# Altium PCB HSR_V2.PcbDoc
Units mm, origin at the board's own origin, x right, y up, seen from the top; angles counter-clockwise.
Board outline 140 x 140 mm, 4 copper layers (Top Layer, Layer 1, Layer 2, Bottom Layer), stack 0.603 mm thick; 53 components, 62 nets, 256 pads, 774 vias.
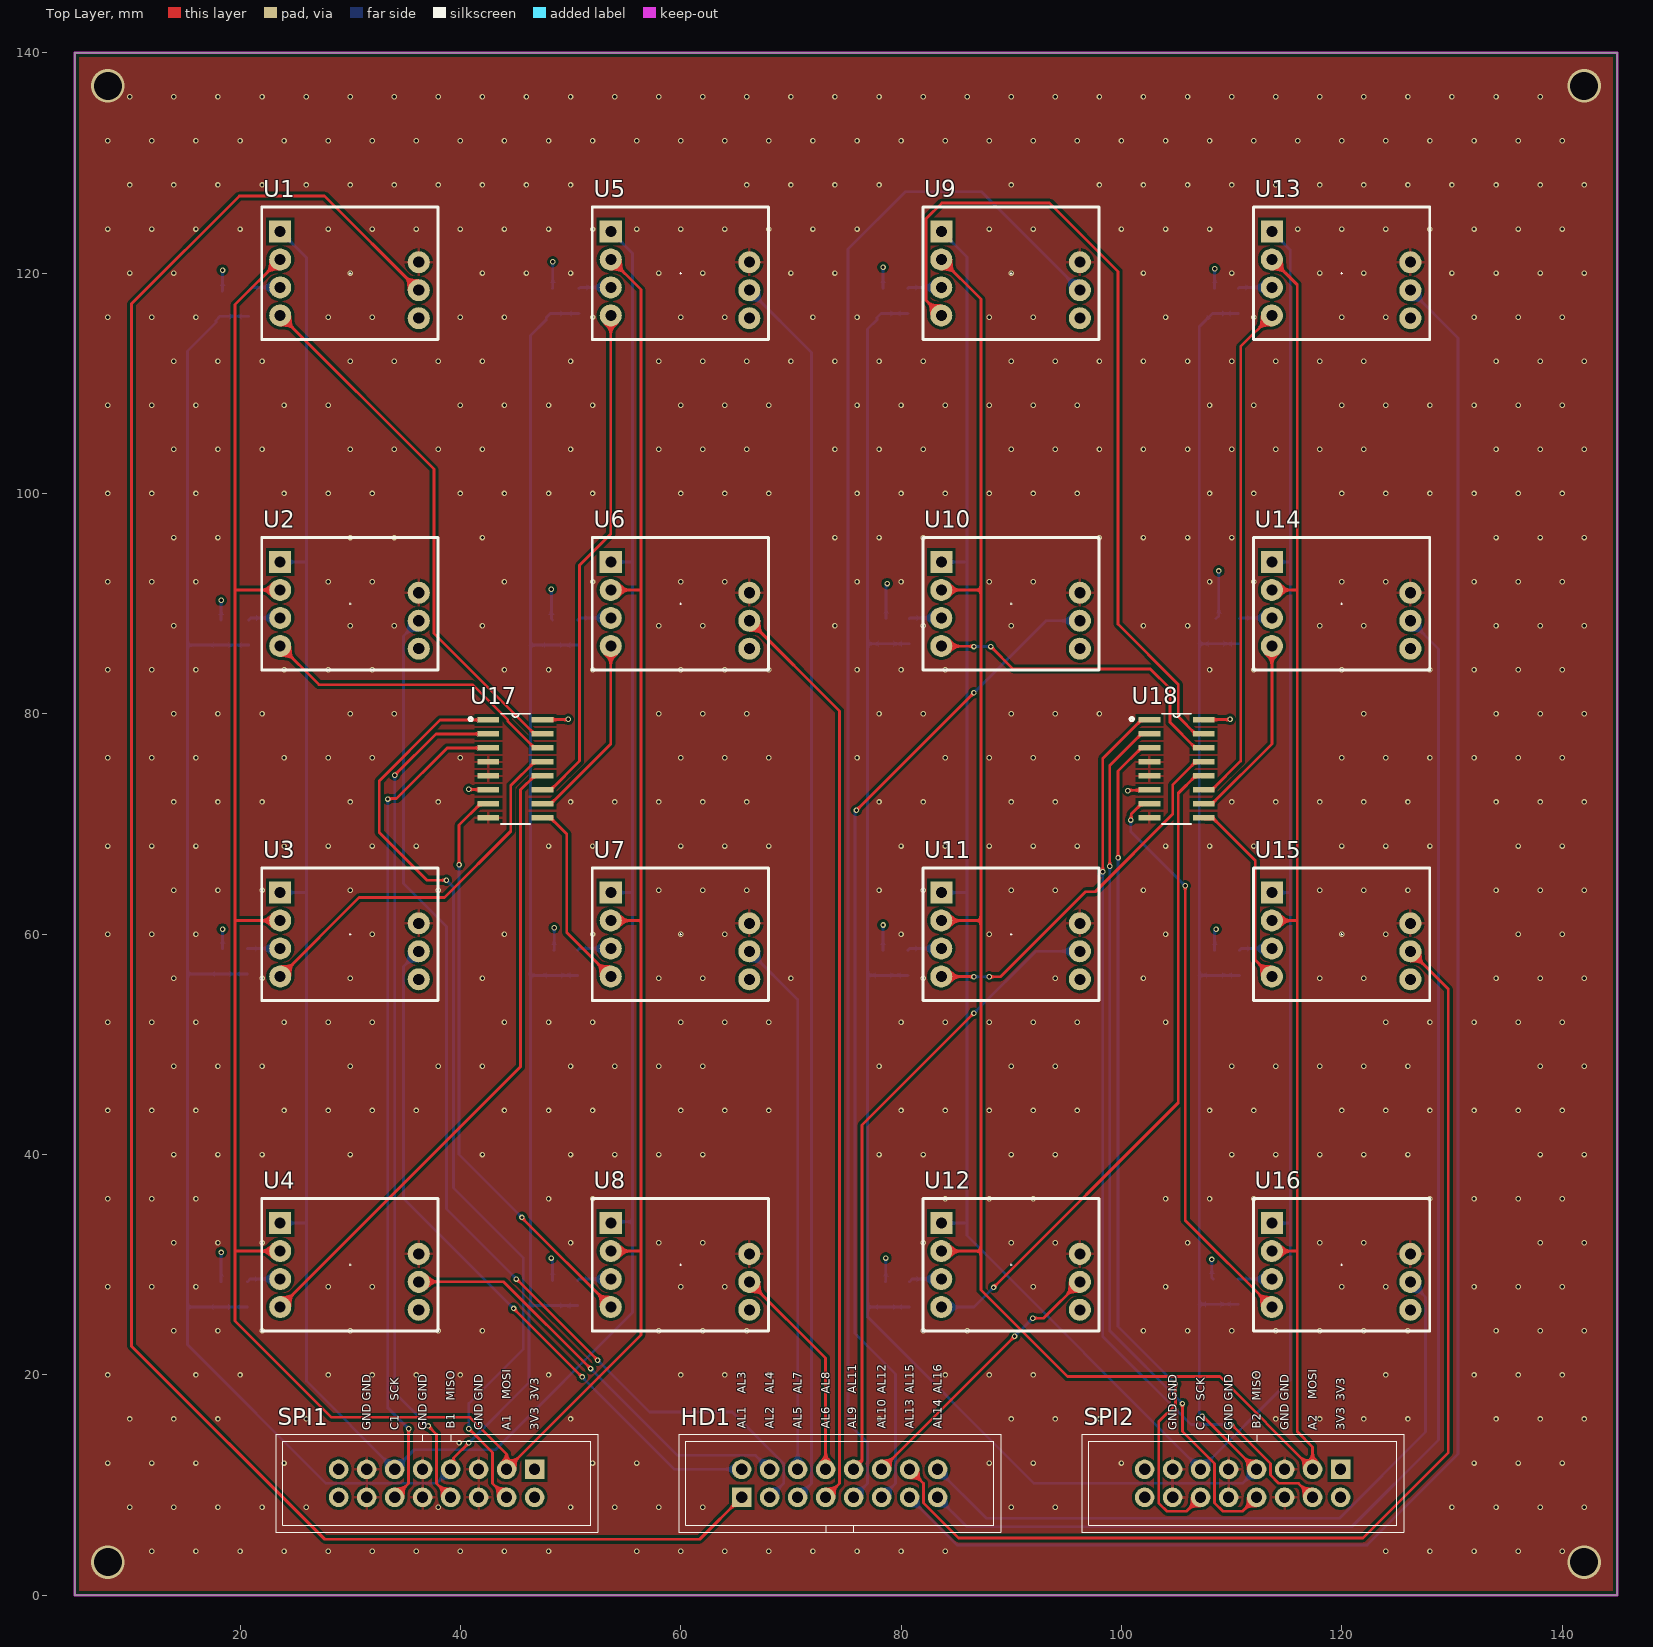
[diagram p0: Top Layer view]
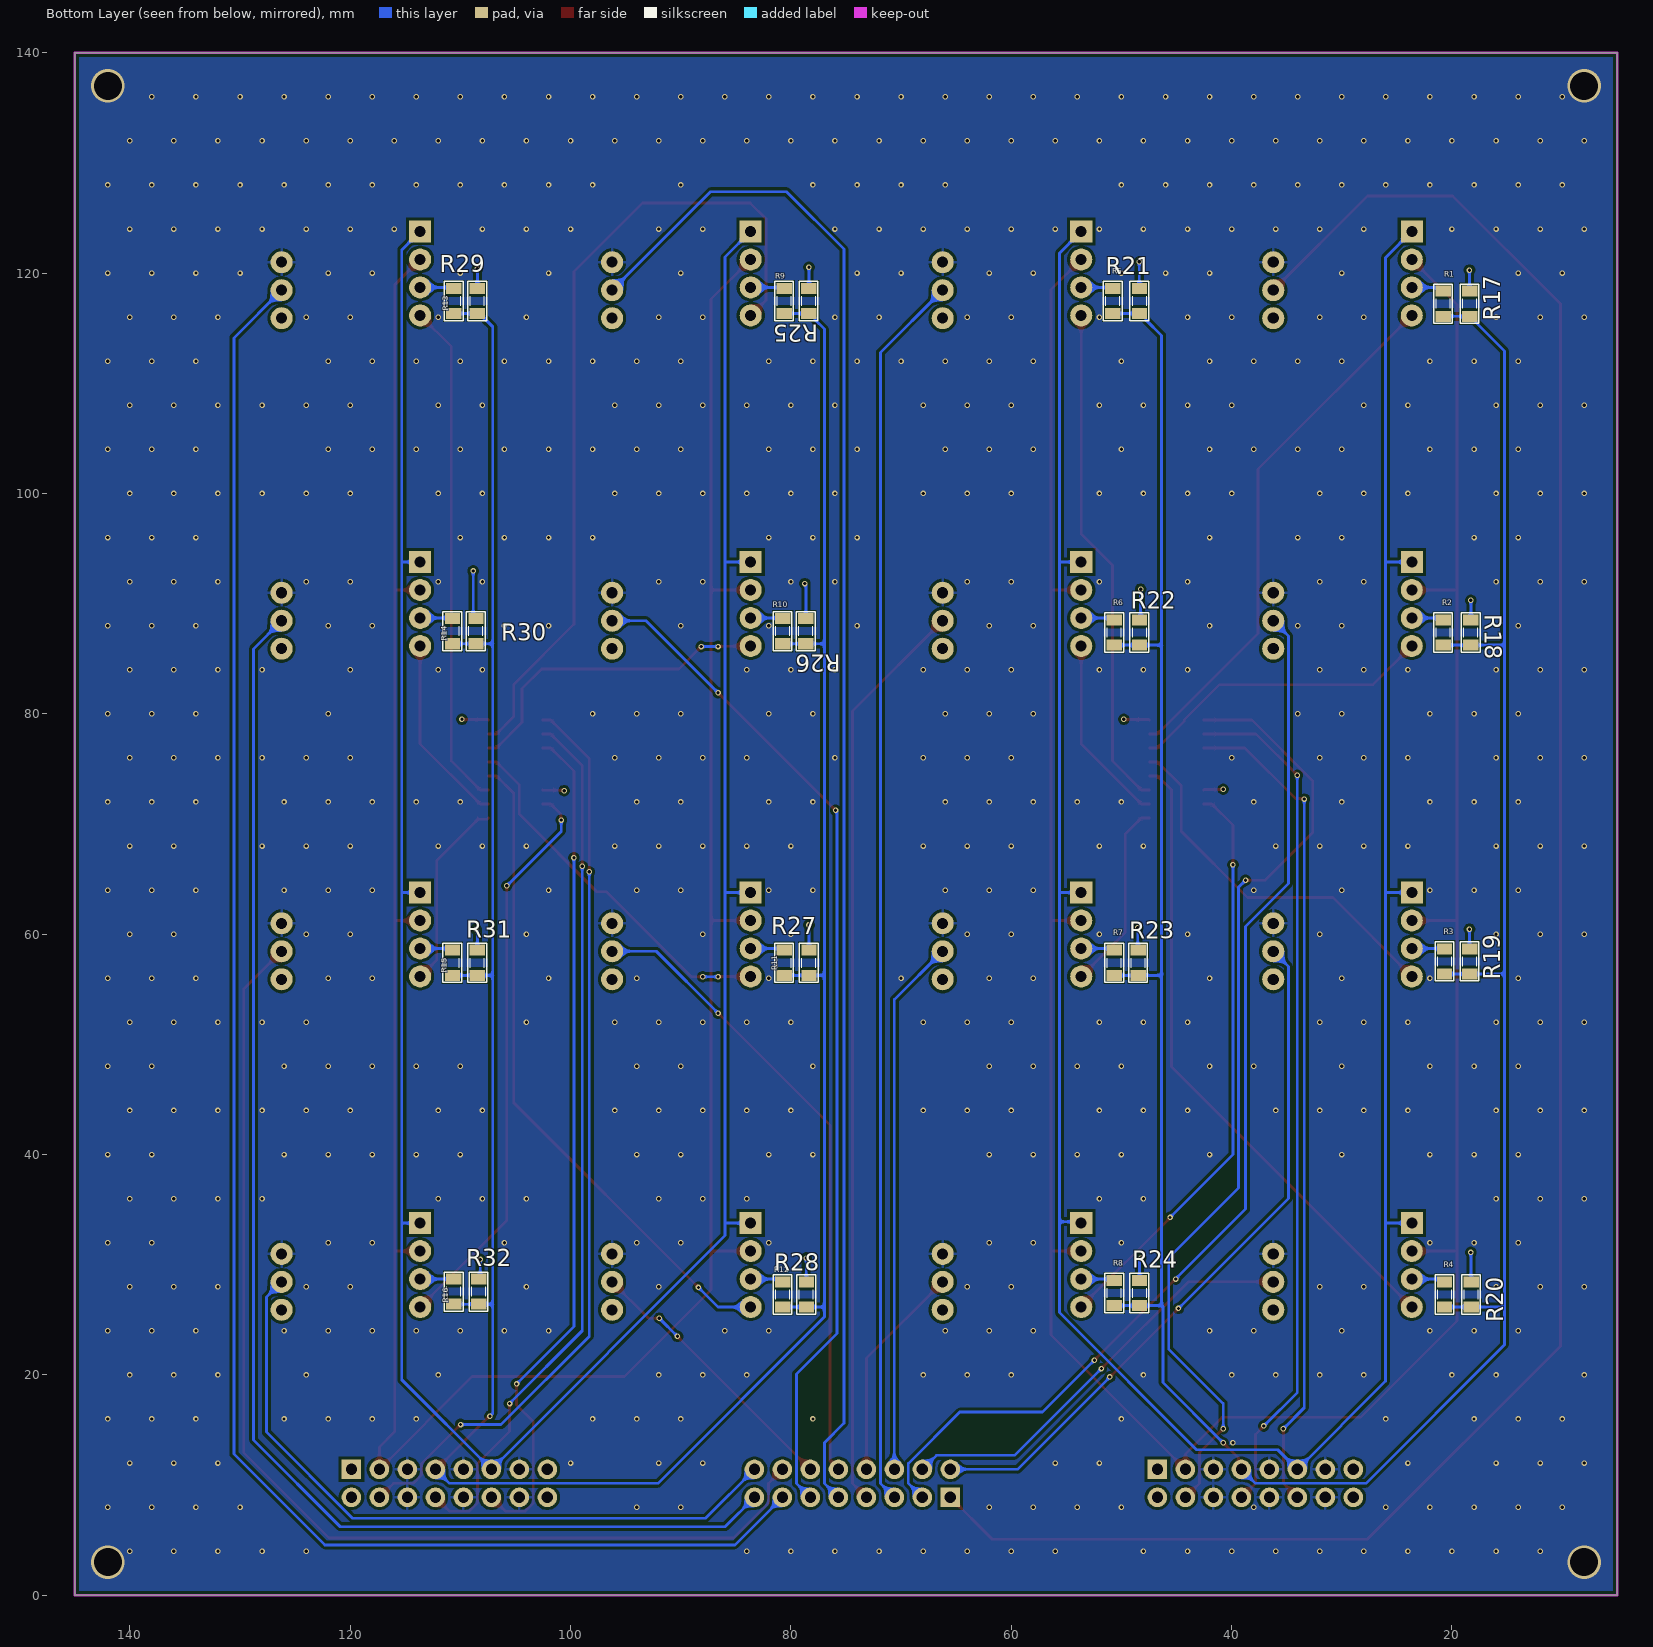
[diagram p1: Bottom Layer view, seen from below]
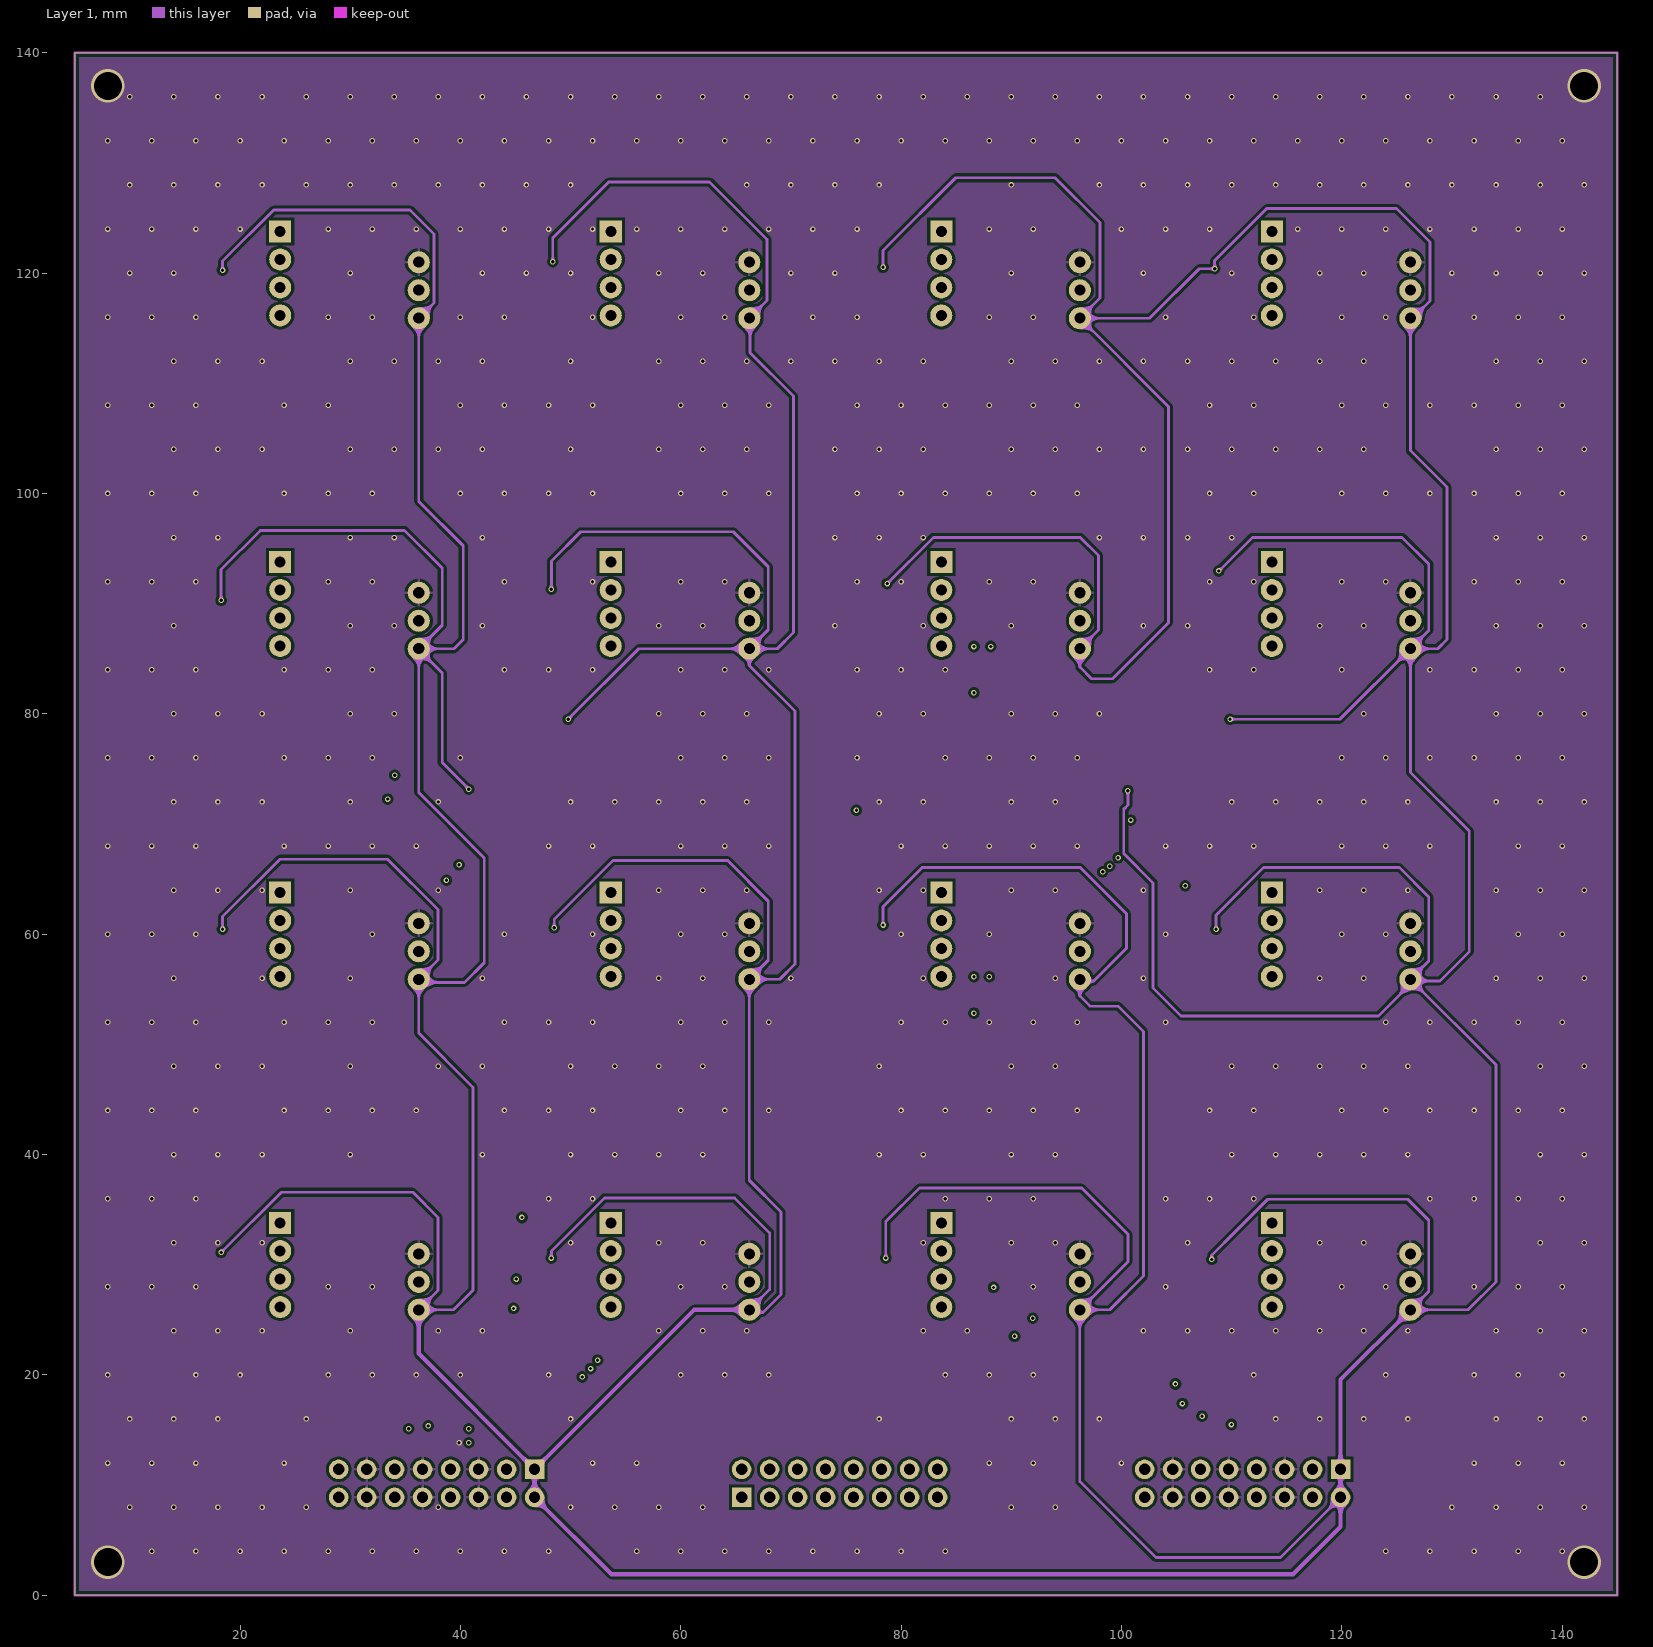
[diagram p2: Layer 1]
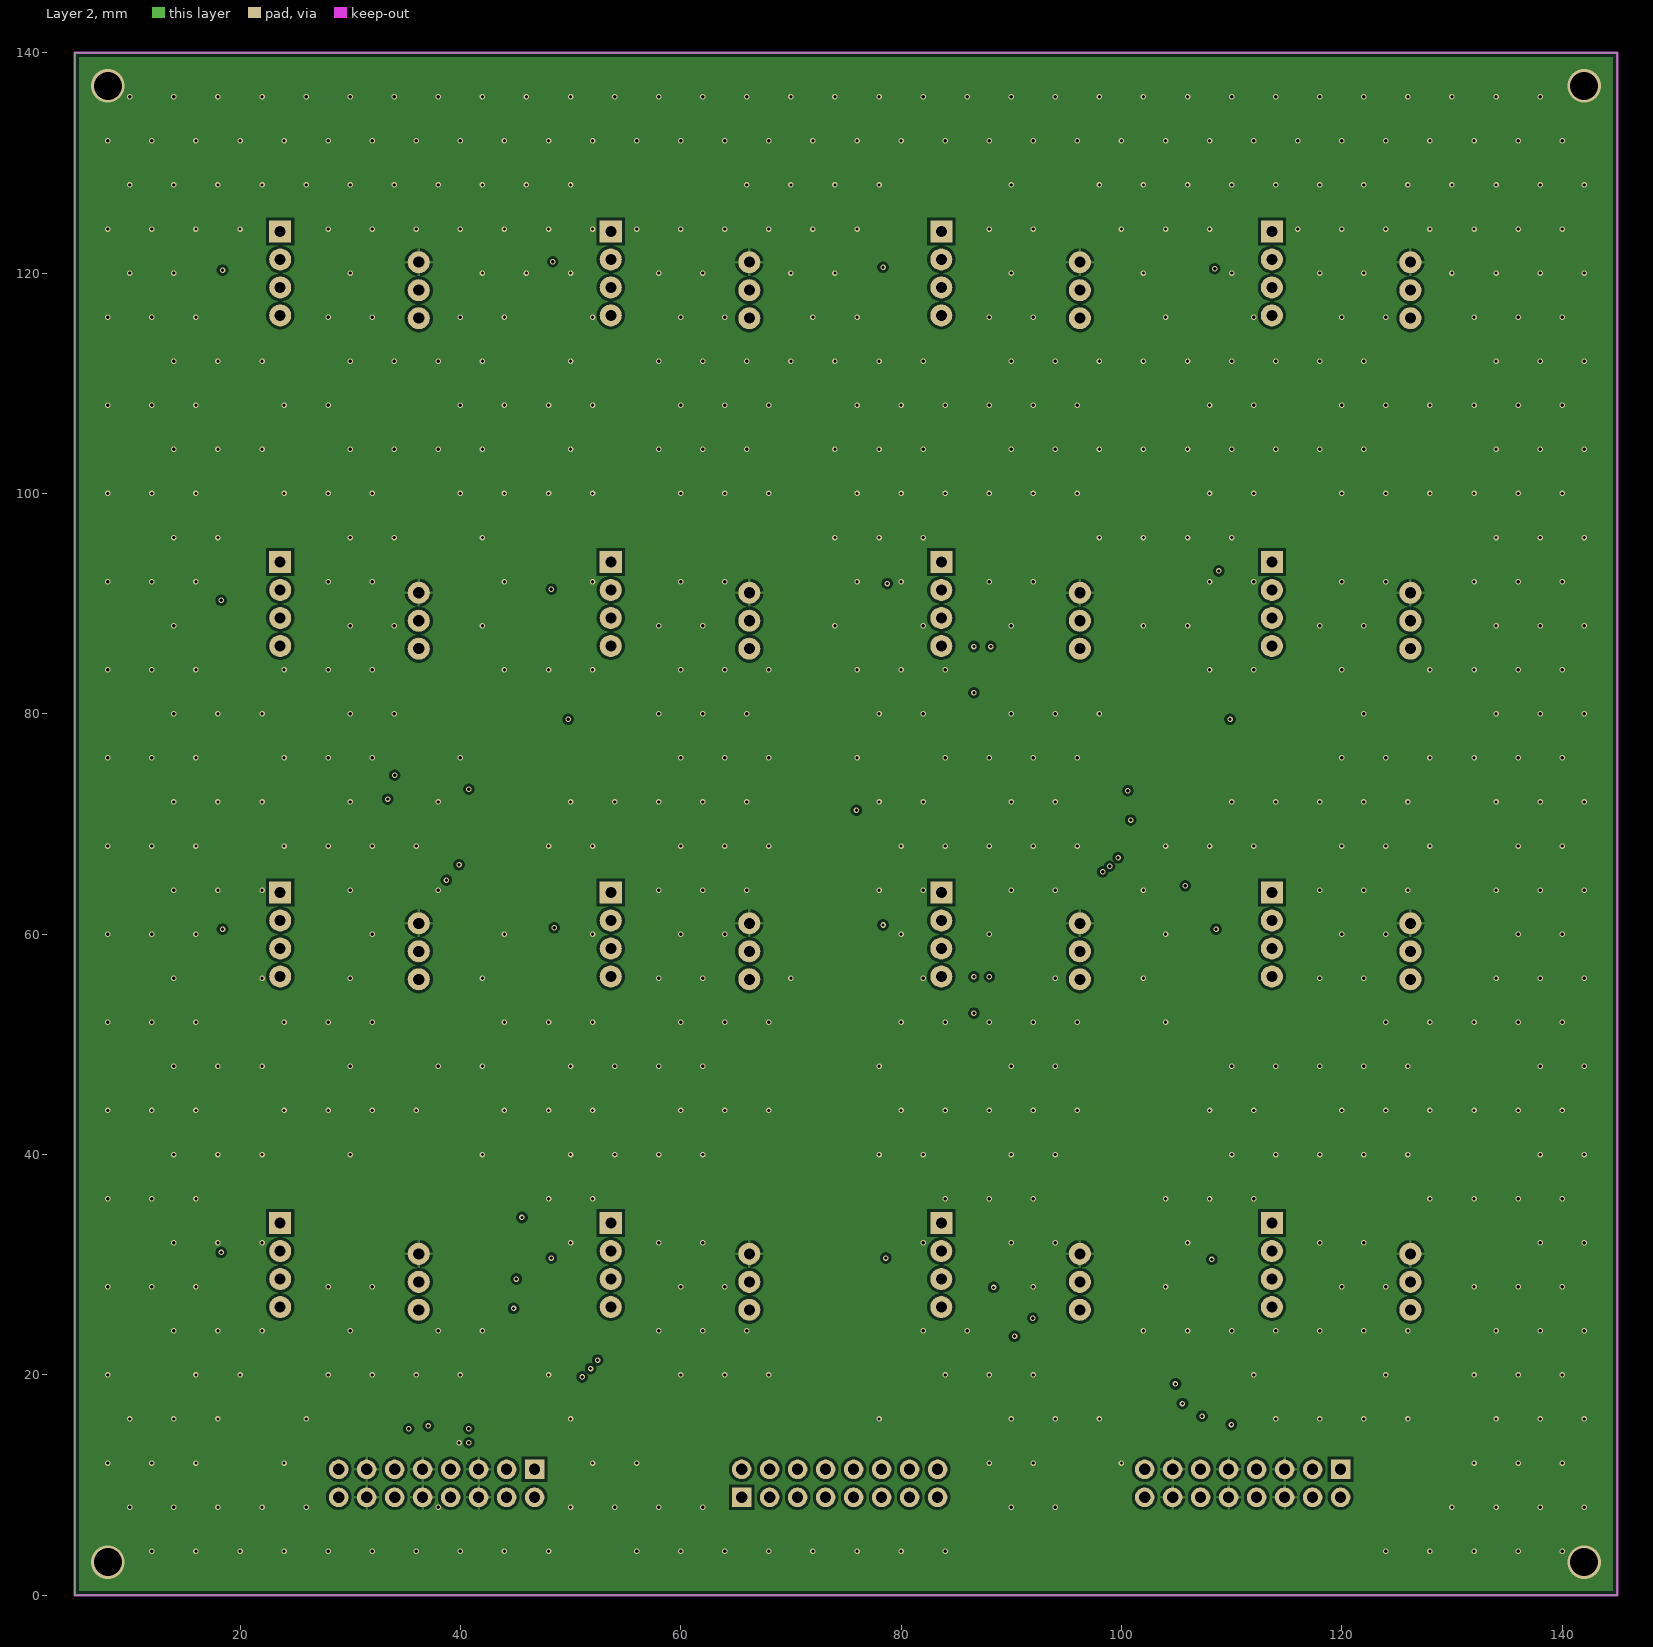
[diagram p3: Layer 2]
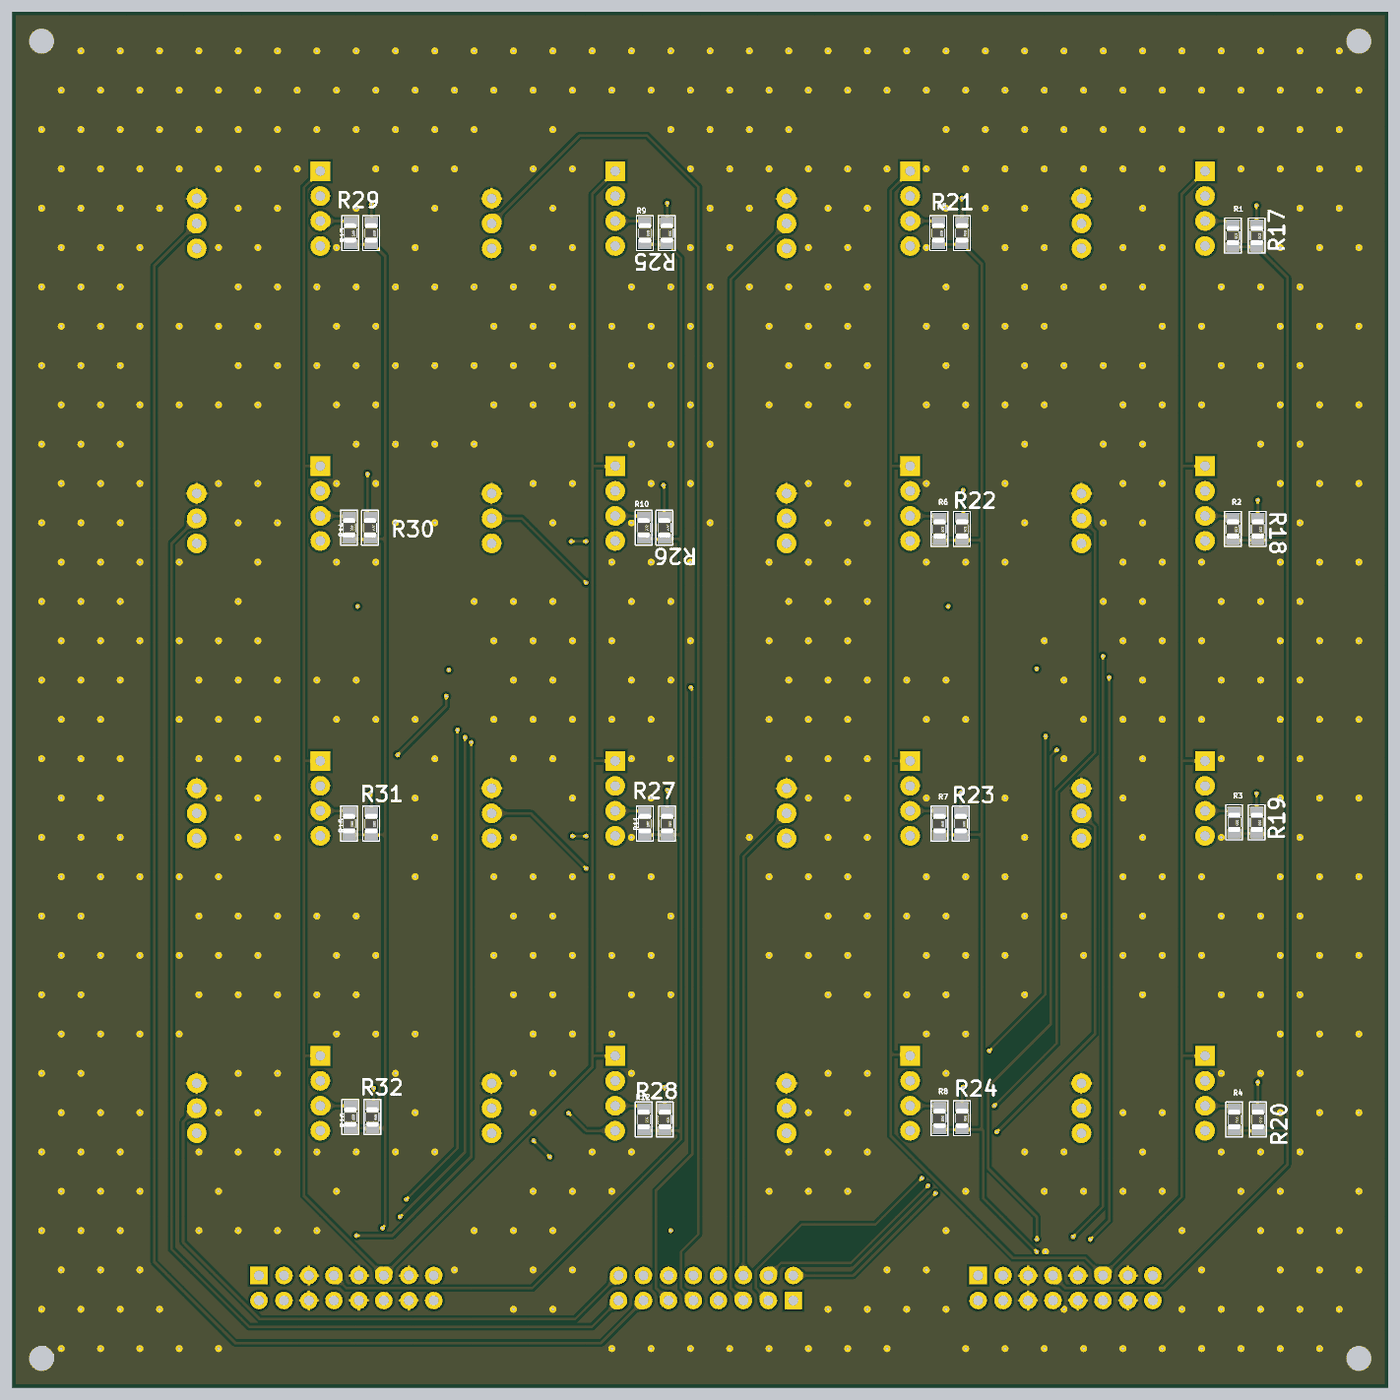
[diagram p4: 3D render of the assembled board from below, using the file's embedded part models]

## Layer stack, top to bottom
Top Solder: solder mask 0.0102, Solder Resist, Dk 3.5
Top Layer: signal copper 0.0356
Dielectric 2: prepreg 0.0711, PP-006, Dk 4.1
Layer 1: signal copper 0.035
Dielectric 1: dielectric 0.32, FR-4, Dk 4.8
Layer 2: signal copper 0.035
Dielectric 3: prepreg 0.0711, PP-006, Dk 4.1
Bottom Layer: signal copper 0.0356
Bottom Solder: solder mask 0.0102, Solder Resist, Dk 3.5

## Board outline
5,0 5,140 145,140 145,0

## Design rules (kind name [scope] priority, off if disabled: settings)
Clearance [All] p1: gap=0.254 ignorepadtopadclearanceinfootprint=FALSE
PolygonConnect [All] p1: connectstyle=Relief reliefconductorwidth=0.254 reliefentries=4 polygonreliefangle="90 Angle" airgapwidth=0.254
RoutingVias [All] p1: holewidth=0.3 width=0.5 viastyle="Through Hole" minholewidth=0.2 minwidth=0.3 maxholewidth=0.711 maxwidth=1.27
SolderMaskExpansion [All] p1: expansion=0.102 istentingtop=FALSE
Width [All] p1: maxlimit=0.991 minlimit=0.254 preferedwidth=0.254 toplayer_maxwidth=0.762 midlayer1_maxwidth=0.762 bottomlayer_maxwidth=0.762 minimp=50.000000 maximp=50.000000 favimp=50.000000
30 further rules are at their usual default settings.

## Components (designator, comment, footprint, x,y, rotation, side; value= is the part's Value field where it differs from the comment)
HD1 "IDC 8X2" IDC16 65.532,8.89 r0 top value="Header 5x2"
R1 "22R" RES-SMD-0805 20.803,117.221 r270 bottom
R2 "22R" RES-SMD-0805 20.803,87.376 r270 bottom
R3 "22R" RES-SMD-0805 20.676,57.531 r270 bottom
R4 "22R" RES-SMD-0805 20.676,27.305 r270 bottom
R5 "22R" RES-SMD-0805 50.775,117.475 r270 bottom
R6 "22R" RES-SMD-0805 50.648,87.376 r270 bottom
R7 "22R" RES-SMD-0805 50.648,57.404 r270 bottom
R8 "22R" RES-SMD-0805 50.648,27.432 r270 bottom
R9 "22R" RES-SMD-0805 80.62,117.475 r270 bottom
R10 "22R" RES-SMD-0805 80.747,87.503 r270 bottom
R11 "22R" RES-SMD-0805 80.62,57.404 r270 bottom
R12 "22R" RES-SMD-0805 80.747,27.305 r270 bottom
R13 "22R" RES-SMD-0805 110.592,117.475 r270 bottom
R14 "22R" RES-SMD-0805 110.719,87.503 r270 bottom
R15 "22R" RES-SMD-0805 110.719,57.404 r270 bottom
R16 "22R" RES-SMD-0805 110.592,27.559 r270 bottom
R17 "10k" RES-SMD-0805 18.39,117.221 r270 bottom
R18 "10k" RES-SMD-0805 18.288,87.376 r270 bottom
R19 "10k" RES-SMD-0805 18.39,57.531 r270 bottom
R20 "10k" RES-SMD-0805 18.263,27.305 r270 bottom
R21 "10k" RES-SMD-0805 48.362,117.475 r270 bottom
R22 "10k" RES-SMD-0805 48.362,87.376 r270 bottom
R23 "10k" RES-SMD-0805 48.489,57.404 r270 bottom
R24 "10k" RES-SMD-0805 48.362,27.432 r270 bottom
R25 "10k" RES-SMD-0805 78.384,117.475 r270 bottom
R26 "10k" RES-SMD-0805 78.638,87.503 r270 bottom
R27 "10k" RES-SMD-0805 78.359,57.404 r270 bottom
R28 "10k" RES-SMD-0805 78.588,27.305 r270 bottom
R29 "10k" RES-SMD-0805 108.458,117.475 r270 bottom
R30 "10k" RES-SMD-0805 108.585,87.503 r270 bottom
R31 "10k" RES-SMD-0805 108.458,57.404 r270 bottom
R32 "10k" RES-SMD-0805 108.331,27.559 r270 bottom
SPI1 "IDC 8X2" IDC16 46.736,11.43 r180 top value="Header 5x2"
SPI2 "IDC 8X2" IDC16 119.888,11.43 r180 top value="Header 5x2"
U1 "TMAG5170_MODULE" "PCBComponent_1 - duplicate" 30,120 r0 top
U2 "TMAG5170_MODULE" "PCBComponent_1 - duplicate" 30,90 r0 top
U3 "TMAG5170_MODULE" "PCBComponent_1 - duplicate" 30,60 r0 top
U4 "TMAG5170_MODULE" "PCBComponent_1 - duplicate" 30,30 r0 top
U5 "TMAG5170_MODULE" "PCBComponent_1 - duplicate" 60,120 r0 top
U6 "TMAG5170_MODULE" "PCBComponent_1 - duplicate" 60,90 r0 top
U7 "TMAG5170_MODULE" "PCBComponent_1 - duplicate" 60,60 r0 top
U8 "TMAG5170_MODULE" "PCBComponent_1 - duplicate" 60,30 r0 top
U9 "TMAG5170_MODULE" "PCBComponent_1 - duplicate" 90,120 r0 top
U10 "TMAG5170_MODULE" "PCBComponent_1 - duplicate" 90,90 r0 top
U11 "TMAG5170_MODULE" "PCBComponent_1 - duplicate" 90,60 r0 top
U12 "TMAG5170_MODULE" "PCBComponent_1 - duplicate" 90,30 r0 top
U13 "TMAG5170_MODULE" "PCBComponent_1 - duplicate" 120,120 r0 top
U14 "TMAG5170_MODULE" "PCBComponent_1 - duplicate" 120,90 r0 top
U15 "TMAG5170_MODULE" "PCBComponent_1 - duplicate" 120,60 r0 top
U16 "TMAG5170_MODULE" "PCBComponent_1 - duplicate" 120,30 r0 top
U17 "SN74LVC138AD" SOIC127P600X175-16N 45,75 r0 top
U18 "SN74LVC138AD" SOIC127P600X175-16N 105,75 r0 top

## Footprints (in the part's own frame and the unit in brackets; to place one, negate y for a bottom-side part, rotate by r counter-clockwise, add the part's x,y. Pads: shape width x height; smd on the part's side, far side on the other; paste and mask are expansions set on the pad)
IDC16 [mil]
  rect 70x70 hole 40: 1(0,0)
  round 70 hole 40: 2(0,100) 3(100,0) 4(100,100) 5(200,0) 6(200,100) 7(300,0) 8(300,100) 9(400,0) 10(400,100) 11(500,0) 12(500,100) 13(600,0) 14(600,100) 15(700,0) 16(700,100)
  silkscreen extent -225,-125 925,225, body extent -225,-125 926,225, height 358
"PCBComponent_1 - duplicate" [mm]
  rect 2x2 hole 1 mask+0.05: 1(-6.35,3.778)
  round 2 hole 1 mask+0.05: 2(-6.35,1.238) 3(-6.35,-1.302) 4(-6.35,-3.842) 5(6.223,-4.092) 6(6.223,-1.552) 7(6.223,0.988)
  silkscreen extent -8.03,-6.02 7.98,6
RES-SMD-0805 [mil]
  rect 39.37x55 smd: 1(-45,0) 2(45,0)
  silkscreen extent -70,-34 70,33, body extent -39,-25 39,25, height 31
SOIC127P600X175-16N [mil]
  rect 78x20 smd: 1(-97,175) 2(-97,125) 3(-97,75) 4(-97,25) 5(-97,-25) 6(-97,-75) 7(-97,-125) 8(-97,-175) 9(97,-175) 10(97,-125) 11(97,-75) 12(97,-25) 13(97,25) 14(97,75) 15(97,125) 16(97,175)
  silkscreen extent -166,-197 52,197, body extent -118,-195 118,195, height 69

## Part data
HD1 SPI1 SPI2: library part "IDC 8x2"
R1 R2 R3 R4 R5 R6 R7 R8 R9 R10 R11 R12 R13 R14 R15 R16 R17 R18 R19 R20 R21 R22 R23 R24 R25 R26 R27 R28 R29 R30 R31 R32: library part "Resistor - SMD", "Resistor SMD", Manufacturer="Generic Components", Class=Passive, Published=08/06/2000, Publisher="Altium Hobart Technology Centre"
U1 U2 U3 U4 U5 U6 U7 U8 U9 U10 U11 U12 U13 U14 U15 U16: "Module TMAG5170 Hall sensor"
U17 U18: "3-Line To 8-Line decoder/Demultiplexer", Package="SOIC-16 Texas Instruments", Check_prices=https://www.snapeda.com/parts/SN74LVC138AD/Texas+Instruments/view-part/?ref=eda, MF="Texas Instruments", MP=SN74LVC138AD, SnapEDA_Link=https://www.snapeda.com/parts/SN74LVC138AD/Texas+Instruments/view-part/?ref=snap

## Via types
v1: diameter 0.5, hole 0.3, Top Layer to Bottom Layer, 716 vias
v2: diameter 0.5, hole 0.3, Top Layer to Bottom Layer, tented top, 54 vias
v3: diameter 3.048, hole 2.54, Top Layer to Bottom Layer, tented top, 4 vias

## Nets (pads, with @x,y where several pads share a name; then routed paths per layer and width w, separated by ;. In a path a pad name is that pad's centre, name@x,y a point inside that pad or via, vN(x,y) a via of type N, cw(c..) or ccw(c..) an arc to the next point about the centre after c; other vN are vias at no path point)
3V3: R17.1 R18.1 R19.1 R20.1 R21.1 R22.1 R23.1 R24.1 R25.1 R26.1 R27.1 R28.1 R29.1 R30.1 R31.1 R32.1 SPI1.1 SPI1.2 SPI2.1 SPI2.2 U1.5 U2.5 U3.5 U4.5 U5.5 U6.5 U7.5 U8.5 U9.5 U10.5 U11.5 U12.5 U13.5 U14.5 U15.5 U16.5 U17.6 U17.16 U18.6 U18.16 | length 1273
  Top Layer w0.254: v2(40.767,73.152) 40.795,73.124 42.508,73.124 U17.6 ; U17.16 47.492,79.473 49.755,79.473 v2(49.784,79.502) ; v2(100.584,73.025) 100.619,73.06 102.501,73.06 U18.6 ; U18.16 107.492,79.473 109.826,79.473 v2(109.855,79.502)
  Layer 1 w0.254: v2(18.288,31.115) 23.749,36.576 35.687,36.576 37.973,34.29 37.973,27.657 U4.5 39.37,25.908 41.148,27.686 41.148,46.101 36.223,51.026 U3.5 ; v2(18.288,90.297) 18.288,93.091 21.844,96.647 34.925,96.647 38.354,93.218 38.354,88.038 U2.5 ; v2(18.415,60.452) 18.415,61.595 23.622,66.802 33.401,66.802 37.973,62.23 37.973,57.657 U3.5 ; v2(18.415,120.269) 18.415,121.081 23.064,125.73 35.433,125.73 37.604,123.559 37.604,117.289 U1.5 36.223,99.286 40.259,95.25 40.259,86.741 39.426,85.908 U2.5 ; v2(40.767,73.152) 38.354,75.565 38.354,83.693 U2.5@36.223,85.824 ; v2(48.26,30.607) 48.26,31.242 53.086,36.068 64.897,36.068 68.072,32.893 68.072,27.756 U8.5 66.458,25.673 67.456,25.673 69.088,27.305 69.088,34.798 66.223,37.663 U7.5 ; v2(48.26,91.313) 48.26,93.853 50.927,96.52 64.77,96.52 67.945,93.345 67.945,87.629 U6.5 ; v2(48.387,121.031) 48.387,123.19 53.467,128.27 62.611,128.27 67.818,123.063 67.818,117.502 U5.5 66.294,115.837 66.294,112.776 70.231,108.839 70.231,87.376 68.763,85.908 U6.5 ; v2(48.514,60.579) 48.514,61.341 53.848,66.675 64.262,66.675 67.945,62.992 67.945,57.629 U7.5 ; v2(49.784,79.502) 56.19,85.908 U6.5 ; v2(78.359,60.833) 78.359,62.484 81.915,66.04 96.266,66.04 100.457,61.849 100.457,58.728 97.456,55.726 96.405,55.726 U11.5 96.223,54.399 97.155,53.467 99.695,53.467 102.003,51.159 102.003,28.978 98.933,25.908 U12.5 ; v2(78.359,120.523) 78.359,122.047 84.963,128.651 93.98,128.651 98.044,124.587 98.044,117.728 U9.5 ; v2(78.613,30.607) 78.613,33.909 81.661,36.957 96.393,36.957 100.584,32.766 100.584,30.268 U12.5 ; v2(78.74,91.821) 82.931,96.012 96.266,96.012 97.917,94.361 97.917,87.601 U10.5 96.223,84.244 97.282,83.185 99.187,83.185 104.267,88.265 104.267,107.864 U9.5 ; v2(100.584,73.025) 100.584,71.716 100.207,71.339 100.207,67.309 102.87,64.646 102.87,55.118 105.41,52.578 123.317,52.578 126.223,55.484 U15.5 ; v2(108.204,30.48) 108.204,30.87 110.372,33.038 113.275,35.941 125.984,35.941 127.889,34.036 127.889,27.573 U16.5 131.445,25.908 133.985,28.448 133.985,48.146 U15.5@126.378,55.753 ; v2(108.585,60.452) 108.585,61.722 112.903,66.04 125.222,66.04 127.889,63.373 127.889,57.573 U15.5 ; v2(108.839,92.964) 111.887,96.012 125.476,96.012 127.889,93.599 127.889,87.573 U14.5 ; v2(109.855,79.502) 119.818,79.502 U14.5 ; SPI2.2 114.427,3.429 103.124,3.429 96.223,10.33 U12.5 ; U3.5 36.505,55.626 40.386,55.626 42.164,57.404 42.164,66.929 36.223,72.87 U2.5@36.223,85.824 ; U2.5@36.223,85.824 U2.5 ; U7.5 68.989,55.908 70.358,57.277 70.358,80.264 66.223,84.399 U6.5 ; U9.5 102.573,115.908 107.061,120.396 v2(108.458,120.396) 108.458,121.124 113.191,125.857 124.968,125.857 128.016,122.809 128.016,117.475 126.449,115.908 U13.5 126.223,103.901 129.54,100.584 129.54,86.741 128.707,85.908 U14.5 ; U15.5 U15.5@126.378,55.753 ; U14.5 126.223,74.691 131.572,69.342 131.572,58.42 128.905,55.753 U15.5@126.378,55.753
  Layer 1 w0.381: U4.5 36.223,21.943 SPI1.1 ; U8.5 61.214,25.908 SPI1.1 ; U16.5 119.888,19.572 SPI2.1 SPI2.2 119.888,6.223 115.57,1.905 53.721,1.905 SPI1.2 SPI1.1
  Bottom Layer w0.254: R20.1 18.288,28.473 v2(18.288,31.115) ; R18.1 v2(18.288,90.297) ; R19.1 18.415,58.699 v2(18.415,60.452) ; R17.1 18.415,118.389 v2(18.415,120.269) ; v2(48.26,91.313) 48.26,88.621 R22.1 ; R24.1 v2@48.362,30.439 ; R21.1 48.387,118.643 v2(48.387,121.031) ; R23.1 48.514,58.572 v2(48.514,60.579) ; R27.1 v2(78.359,60.833) ; v2(78.359,120.523) 78.359,118.643 R25.1 ; R28.1 78.613,28.473 v2(78.613,30.607) ; R26.1 78.638,91.653 78.74,91.754 v2(78.74,91.821) ; v2(108.204,30.48) 108.204,28.829 R32.1 ; R31.1 108.458,60.258 108.585,60.385 v2(108.585,60.452) ; R29.1 v2(108.458,120.396) ; R30.1 108.839,88.9 v2(108.839,92.964)
A1: SPI1.4 U17.1 | length 87.1
  Top Layer w0.254: v2(38.735,64.897) 36.957,64.897 32.639,69.215 32.639,73.917 38.167,79.445 U17.1 ; v2(40.767,15.113) 42.926,12.954 42.926,10.16 SPI1.4
  Bottom Layer w0.254: v2(38.735,64.897) 39.37,64.262 39.37,36.957 45.716,30.611 45.716,22.348 40.767,17.399 v2(40.767,15.113)
A2: SPI2.4 U18.1 | length 83.9
  Top Layer w0.254: v2(98.298,65.659) 98.298,75.943 101.8,79.445 U18.1 ; v2(109.982,15.494) 110,15.494 113.538,11.956 113.538,10.904 114.282,10.16 115.334,10.16 116.078,10.16 SPI2.4
  Bottom Layer w0.254: v2(98.298,65.659) 98.298,23.495 106.299,15.494 v2(109.982,15.494)
AL1: HD1.1 U1.6 | length 192.5
  Top Layer w0.254: U1.6 27.671,127 19.939,127 10.16,117.221 10.16,22.606 27.686,5.08 61.722,5.08 HD1.1
AL2: HD1.3 U2.6 | length 99.7
  Top Layer w0.254: v2(45.085,28.702) v2(52.451,21.336)
  Layer 1 w0.254: U2.6@36.195,88.265 36.223,88.293 U2.6
  Layer 2 w0.254: U2.6@36.041,88.265 U2.6@36.195,88.265
  Bottom Layer w0.254: U2.6 34.842,87.067 34.842,64.599 38.735,60.706 38.735,35.052 v2(45.085,28.702) ; v2(52.451,21.336) 57.164,16.623 64.676,16.623 69.342,11.956 69.342,10.16 HD1.3
AL3: HD1.2 U3.6 | length 63.9
  Top Layer w0.254: v2(44.831,26.035) v2(51.054,19.812)
  Bottom Layer w0.254: U3.6 34.842,57.067 34.842,36.024 v2(44.831,26.035) ; v2(51.054,19.812) 59.436,11.43 HD1.2
AL4: HD1.4 U4.6 | length 38.9
  Top Layer w0.254: U4.6 43.942,28.448 v2(51.816,20.574)
  Bottom Layer w0.254: v2(51.816,20.574) 59.69,12.7 66.802,12.7 HD1.4
AL5: HD1.5 U5.6 | length 112.4
  Bottom Layer w0.254: U5.6 71.882,112.789 71.882,10.16 HD1.5
AL6: HD1.7 U6.6 | length 83.5
  Top Layer w0.254: U6.6 74.422,80.249 74.422,10.16 HD1.7
AL7: HD1.6 U7.6 | length 48.8
  Bottom Layer w0.254: U7.6 70.612,54.059 HD1.6
AL8: HD1.8 U8.6 | length 19.9
  Top Layer w0.254: U8.6 73.152,21.519 HD1.8
AL9: HD1.9 U9.6 | length 141.4
  Bottom Layer w0.254: HD1.9 76.962,10.16 76.962,13.843 75.184,15.621 75.184,122.174 80.391,127.381 87.29,127.381 U9.6
AL10: HD1.11 U10.6 | length 91.9
  Top Layer w0.254: v2(75.946,71.247) 86.61,81.911 v2(86.61,81.915)
  Bottom Layer w0.254: v2(75.946,71.247) 75.946,71.18 75.819,71.053 75.819,23.749 79.502,20.066 79.502,10.16 HD1.11 ; v2(86.61,81.915) 93.143,88.448 U10.6
AL11: HD1.10 U11.6 | length 57.9
  Top Layer w0.254: HD1.10 75.692,11.492 76.454,12.254 76.454,42.676 v2(86.61,52.832)
  Bottom Layer w0.254: v2(86.61,52.832) 92.226,58.448 U11.6
AL12: HD1.12 U12.6 | length 25
  Top Layer w0.254: HD1.12 v2(90.297,23.495) ; v2(91.948,25.146) 92.922,25.146 U12.6
  Bottom Layer w0.254: v2(90.297,23.495) v2(91.948,25.146)
AL13: HD1.13 U13.6 | length 162.4
  Bottom Layer w0.254: HD1.13 85.09,4.572 122.301,4.572 130.556,12.827 130.556,114.115 U13.6
AL14: HD1.15 U14.6 | length 125.2
  Bottom Layer w0.254: HD1.15 85.979,6.223 120.904,6.223 128.778,14.097 128.778,85.893 U14.6
AL15: HD1.14 U15.6 | length 102.7
  Top Layer w0.254: HD1.14 82.042,10.16 82.042,8.364 85.199,5.207 121.92,5.207 129.667,12.954 129.667,55.004 U15.6
AL16: HD1.16 U16.6 | length 63.6
  Bottom Layer w0.254: HD1.16 87.757,6.985 119.779,6.985 127.604,14.81 127.604,27.067 U16.6
B1: SPI1.8 U17.2 | length 77.7
  Top Layer w0.254: v2(34.036,74.422) 37.789,78.175 U17.2 ; v2(37.084,15.367) 37.846,14.605 37.846,10.16 SPI1.8
  Bottom Layer w0.254: v2(34.036,74.422) 34.036,18.415 v2(37.084,15.367)
B2: SPI2.8 U18.2 | length 80.3
  Top Layer w0.254: v2(98.933,66.167) 98.933,75.308 101.8,78.175 U18.2 ; v2(105.537,17.399) 105.537,14.877 108.458,11.956 108.458,8.364 109.202,7.62 110.998,7.62 SPI2.8
  Bottom Layer w0.254: v2(98.933,66.167) 98.933,24.003 v2(105.537,17.399)
C1: SPI1.12 U17.3 | length 75.7
  Top Layer w0.254: v2(33.405,72.263) 33.452,72.31 34.21,72.31 38.805,76.905 U17.3 ; SPI1.12 35.306,10.16 v2(35.306,15.113)
  Bottom Layer w0.254: v2(33.405,72.263) 33.405,17.014 v2(35.306,15.113)
C2: SPI2.12 U18.3 | length 77.6
  Top Layer w0.254: v2(99.695,66.929) 99.695,74.8 101.8,76.905 U18.3 ; v2(104.902,19.177) 104.902,17.272 103.378,15.748 103.378,11.437 ccw(c104.648,11.43) 103.378,11.423 103.378,8.897 ccw(c104.648,8.89) 103.378,8.883 103.378,8.364 103.452,8.29 104.122,7.62 105.918,7.62 SPI2.12
  Bottom Layer w0.254: v2(99.695,66.929) 99.695,24.384 v2(104.902,19.177)
GND: SPI1.5 SPI1.6 SPI1.9 SPI1.10 SPI1.13 SPI1.14 SPI2.5 SPI2.6 SPI2.9 SPI2.10 SPI2.13 SPI2.14 U1.7 U2.7 U3.7 U4.7 U5.7 U6.7 U7.7 U8.7 U9.7 U10.7 U11.7 U12.7 U13.7 U14.7 U15.7 U16.7 U17.4 U17.5 U17.8 U18.4 U18.5 U18.8
  other v1: 12,4 16,4 20,4 24,4 28,4 32,4 36,4 40,4 44,4 48,4 56,4 60,4 64,4 68,4 72,4 76,4 80,4 84,4 124,4 128,4 132,4 136,4 140,4 10,8 14,8 18,8 22,8 26,8 38,8 50,8 54,8 58,8 62,8 90,8 94,8 130,8 134,8 138,8 142,8 8,12 12,12 16,12 24,12 52,12 56,12 88,12 92,12 100,12 132,12 136,12 140,12 10,16 14,16 18,16 26,16 50,16 78,16 90,16 94,16 98,16 114,16 118,16 122,16 126,16 134,16 138,16 142,16 8,20 16,20 20,20 28,20 32,20 36,20 40,20 48,20 60,20 64,20 68,20 84,20 88,20 92,20 112,20 124,20 132,20 136,20 140,20 14,24 18,24 22,24 30,24 38,24 42,24 58,24 62,24 66,24 82,24 86,24 102,24 106,24 110,24 114,24 118,24 122,24 126,24 134,24 138,24 142,24 8,28 12,28 16,28 28,28 32,28 60,28 64,28 92,28 104,28 120,28 124,28 132,28 136,28 140,28 14,32 18,32 22,32 50,32 58,32 62,32 82,32 90,32 94,32 106,32 118,32 122,32 138,32 142,32 8,36 12,36 16,36 48,36 52,36 84,36 88,36 92,36 104,36 108,36 112,36 128,36 132,36 136,36 140,36 14,40 18,40 22,40 30,40 42,40 50,40 54,40 58,40 62,40 78,40 82,40 90,40 94,40 110,40 114,40 118,40 122,40 126,40 138,40 142,40 8,44 12,44 16,44 24,44 28,44 32,44 36,44 44,44 48,44 52,44 60,44 64,44 68,44 80,44 84,44 88,44 92,44 96,44 108,44 112,44 120,44 124,44 128,44 132,44 136,44 140,44 14,48 18,48 22,48 30,48 38,48 42,48 50,48 54,48 58,48 62,48 78,48 90,48 94,48 110,48 114,48 118,48 122,48 126,48 138,48 142,48 8,52 12,52 16,52 24,52 28,52 32,52 44,52 48,52 52,52 60,52 64,52 68,52 80,52 84,52 88,52 92,52 96,52 104,52 124,52 128,52 132,52 136,52 140,52 14,56 22,56 30,56 42,56 58,56 62,56 70,56 82,56 94,56 102,56 118,56 122,56 134,56 138,56 142,56 8,60 12,60 16,60 32,60 44,60 52,60 60,60 64,60 80,60 88,60 104,60 120,60 124,60 136,60 140,60 14,64 18,64 22,64 30,64 38,64 58,64 62,64 66,64 78,64 82,64 90,64 94,64 102,64 118,64 122,64 126,64 134,64 138,64 142,64 8,68 12,68 16,68 24,68 28,68 32,68 36,68 48,68 52,68 60,68 64,68 68,68 80,68 84,68 88,68 92,68 96,68 104,68 108,68 112,68 120,68 124,68 128,68 136,68 140,68 14,72 18,72 22,72 30,72 38,72 50,72 54,72 58,72 62,72 66,72 78,72 82,72 90,72 94,72 110,72 114,72 118,72 122,72 126,72 134,72 138,72 142,72 8,76 12,76 16,76 24,76 28,76 32,76 40,76 60,76 64,76 68,76 76,76 84,76 88,76 92,76 96,76 120,76 124,76 128,76 132,76 136,76 140,76 14,80 18,80 22,80 30,80 34,80 58,80 62,80 66,80 78,80 82,80 90,80 94,80 98,80 122,80 134,80 138,80 142,80 8,84 12,84 16,84 24,84 28,84 32,84 44,84 48,84 52,84 60,84 64,84 68,84 76,84 80,84 84,84 108,84 112,84 120,84 128,84 132,84 136,84 140,84 14,88 30,88 34,88 42,88 58,88 62,88 74,88 82,88 90,88 102,88 106,88 118,88 122,88 134,88 138,88 142,88 8,92 12,92 16,92 28,92 32,92 44,92 52,92 60,92 64,92 76,92 80,92 88,92 92,92 108,92 112,92 120,92 124,92 132,92 136,92 140,92 14,96 18,96 30,96 34,96 42,96 74,96 78,96 82,96 98,96 102,96 106,96 110,96 134,96 138,96 142,96 8,100 12,100 16,100 24,100 28,100 32,100 40,100 44,100 48,100 52,100 60,100 64,100 68,100 76,100 80,100 84,100 88,100 92,100 96,100 108,100 112,100 120,100 124,100 128,100 132,100 136,100 140,100 14,104 18,104 22,104 30,104 34,104 38,104 42,104 50,104 58,104 62,104 66,104 74,104 78,104 82,104 90,104 94,104 98,104 102,104 106,104 110,104 114,104 118,104 122,104 134,104 138,104 142,104 8,108 12,108 16,108 24,108 28,108 40,108 44,108 48,108 52,108 60,108 64,108 68,108 76,108 80,108 84,108 88,108 92,108 96,108 108,108 112,108 120,108 124,108 128,108 132,108 136,108 140,108 14,112 18,112 22,112 30,112 34,112 38,112 42,112 50,112 58,112 62,112 66,112 70,112 74,112 78,112 82,112 90,112 94,112 98,112 102,112 106,112 110,112 114,112 118,112 122,112 134,112 138,112 142,112 8,116 12,116 16,116 28,116 32,116 40,116 44,116 52,116 60,116 64,116 72,116 76,116 88,116 92,116 104,116 112,116 120,116 124,116 132,116 136,116 140,116 10,120 14,120 30,120 42,120 46,120 50,120 58,120 62,120 70,120 74,120 90,120 102,120 110,120 118,120 122,120 130,120 134,120 138,120 142,120 8,124 12,124 16,124 20,124 28,124 32,124 36,124 40,124 44,124 48,124 52,124 56,124 60,124 64,124 68,124 72,124 76,124 88,124 92,124 100,124 104,124 108,124 116,124 120,124 124,124 128,124 132,124 136,124 140,124 10,128 14,128 18,128 22,128 26,128 30,128 34,128 38,128 42,128 46,128 50,128 66,128 70,128 74,128 78,128 90,128 98,128 102,128 106,128 110,128 114,128 118,128 122,128 126,128 130,128 134,128 138,128 142,128 8,132 12,132 16,132 20,132 24,132 28,132 32,132 36,132 40,132 44,132 48,132 52,132 56,132 60,132 64,132 68,132 72,132 76,132 80,132 84,132 88,132 92,132 96,132 100,132 104,132 108,132 112,132 116,132 120,132 124,132 128,132 132,132 136,132 140,132 10,136 14,136 18,136 22,136 26,136 30,136 34,136 38,136 42,136 46,136 50,136 54,136 58,136 62,136 66,136 70,136 74,136 78,136 82,136 86,136 90,136 94,136 98,136 102,136 106,136 110,136 114,136 118,136 122,136 126,136 130,136 134,136 138,136
  other v2: 39.878,13.847
  other v3: 8,3 142,3 8,137 142,137
NetR1_1: R1.1 U1.3 | length 3
  Bottom Layer w0.254: R1.1 21.136,118.698 U1.3
NetR2_1: R2.1 U2.3 | length 2.9
  Bottom Layer w0.254: R2.1 20.981,88.698 U2.3
NetR3_1: R3.1 U3.3 | length 3
  Bottom Layer w0.254: R3.1 20.699,58.698 U3.3
NetR4_1: R4.1 U4.3 | length 3.1
  Bottom Layer w0.254: R4.1 20.925,28.698 U4.3
NetR5_1: R5.1 U5.3 | length 2.9
  Bottom Layer w0.254: R5.1 50.854,118.698 U5.3
NetR6_1: R6.1 U6.3 | length 3.1
  Bottom Layer w0.254: R6.1 50.826,88.698 U6.3
NetR7_1: R7.1 U7.3 | length 3.1
  Bottom Layer w0.254: R7.1 50.798,58.698 U7.3
NetR8_1: R8.1 U8.3 | length 3.1
  Top Layer w0.254: U8.3@53.648,28.7 U8.3
  Bottom Layer w0.254: R8.1 50.77,28.698 U8.3
NetR9_1: R9.1 U9.3 | length 3.1
  Top Layer w0.254: U9.3@83.627,118.721 U9.3
  Bottom Layer w0.254: R9.1 80.699,118.698 U9.3
NetR10_1: R10.1 U10.3 | length 3
  Top Layer w0.254: U10.3@83.624,88.672 U10.3
  Bottom Layer w0.254: R10.1 80.798,88.698 U10.3
NetR11_1: R11.1 U11.3 | length 3.1
  Bottom Layer w0.254: R11.1 80.77,58.698 U11.3
NetR12_1: R12.1 U12.3 | length 3
  Bottom Layer w0.254: R12.1 80.996,28.698 U12.3
NetR13_1: R13.1 U13.3 | length 3.1
  Top Layer w0.254: U13.3@113.61,118.658 U13.3
  Bottom Layer w0.254: R13.1 110.671,118.698 U13.3
NetR14_1: R14.1 U14.3 | length 3
  Top Layer w0.254: U14.3@113.613,88.735 U14.3
  Bottom Layer w0.254: R14.1 110.77,88.698 U14.3
NetR15_1: R15.1 U15.3 | length 3
  Top Layer w0.254: U15.3@113.638,58.686 U15.3
  Bottom Layer w0.254: R15.1 110.869,58.698 U15.3
NetR16_1: R16.1 U16.3 | length 3.1
  Bottom Layer w0.254: R16.1 110.596,28.698 U16.3
SENS1: U1.4 U17.15 | length 48.3
  Top Layer w0.254: U1.4 37.604,102.204 37.604,87.298 46.727,78.175 U17.15
SENS2: U2.4 U17.14 | length 27.7
  Top Layer w0.254: U2.4 27.161,82.647 41.117,82.647 44.294,79.471 44.294,79.338 46.727,76.905 U17.14
SENS3: U3.4 U17.13 | length 34.3
  Top Layer w0.254: U3.4 30.81,63.318 38.553,63.318 44.577,69.342 44.577,73.485 46.727,75.635 U17.13
SENS4: U4.4 U17.12 | length 58.5
  Top Layer w0.254: U4.4 45.466,47.974 45.466,73.104 46.727,74.365 U17.12
SENS5: U5.4 U17.11 | length 46.1
  Top Layer w0.254: U17.11 48.2,73.095 50.822,75.716 50.822,93.488 53.65,96.317 U5.4
SENS6: U6.4 U17.10 | length 17.3
  Top Layer w0.254: U17.10 48.2,71.825 53.65,77.275 U6.4
SENS7: U7.4 U17.9 | length 17.4
  Top Layer w0.254: U17.9 48.2,70.555 49.657,69.098 49.657,60.151 U7.4
SENS8: U8.4 U17.7 | length 52.9
  Top Layer w0.254: v2(39.878,66.294) 39.878,69.903 41.8,71.825 U17.7 ; v2(45.593,34.29) 45.593,34.253 53.65,26.195 U8.4
  Bottom Layer w0.254: v2(39.878,66.294) 39.878,40.005 v2(45.593,34.29)
SENS9: U9.4 U18.15 | length 75.6
  Top Layer w0.254: U9.4 82.269,117.539 82.269,124.936 83.699,126.365 93.472,126.365 99.695,120.142 99.695,88.138 105.156,82.677 105.156,79.746 106.727,78.175 U18.15
SENS10: U10.4 U18.14 | length 29.5
  Top Layer w0.254: U10.4 83.676,86.132 86.588,86.132 v2(86.614,86.106) ; v2(88.138,86.106) 90.17,84.074 102.616,84.074 104.394,82.296 104.394,79.238 106.727,76.905 U18.14
  Layer 2 w0.254: U10.4 U10.4@83.676,86.132 ; v2@88.112,86.132 v2(88.138,86.106)
  Bottom Layer w0.254: v2(86.614,86.106) v2(88.138,86.106)
SENS11: U11.4 U18.13 | length 33.5
  Top Layer w0.254: U11.4 83.656,56.152 86.592,56.152 v2(86.61,56.134) ; v2(88.011,56.134) 89.027,56.134 96.746,63.853 97.618,63.853 104.648,70.883 104.648,73.556 106.727,75.635 U18.13
  Layer 2 w0.254: U11.4 U11.4@83.662,56.146 ; v2@87.999,56.146 v2(88.011,56.134)
  Bottom Layer w0.254: v2(86.61,56.134) v2(88.011,56.134)
SENS12: U12.4 U18.12 | length 60.2
  Top Layer w0.254: v2(88.392,27.94) 105.156,44.704 105.156,72.794 106.727,74.365 U18.12
  Bottom Layer w0.254: U12.4 86.61,26.158 v2(88.392,27.94)
SENS13: U13.4 U18.11 | length 46.1
  Top Layer w0.254: U18.11 108.2,73.095 110.822,75.716 110.822,113.329 U13.4
SENS14: U14.4 U18.10 | length 17.3
  Top Layer w0.254: U18.10 108.2,71.825 113.65,77.275 U14.4
SENS15: U15.4 U18.9 | length 17.4
  Top Layer w0.254: U18.9 107.591,70.428 108.388,70.428 112.141,66.675 112.141,57.667 U15.4
SENS16: U16.4 U18.7 | length 52.1
  Top Layer w0.254: v2(100.838,70.358) 100.885,70.405 100.885,70.91 101.8,71.825 U18.7 ; v2(105.791,64.389) 105.791,34.017 U16.4
  Bottom Layer w0.254: v2(100.838,70.358) 100.838,69.342 v2(105.791,64.389)
SPI1_MISO: R1.2 R2.2 R3.2 R4.2 R5.2 R6.2 R7.2 R8.2 R17.2 R18.2 R19.2 R20.2 R21.2 R22.2 R23.2 R24.2 SPI1.7 | length 268.1
  Top Layer w0.254: SPI1.7 39.379,11.693 39.379,12.455 v2(40.767,13.843)
  Layer 2 w0.254: SPI1.7 SPI1.7@39.878,11.43 ; v2@40.758,13.834 v2(40.767,13.843)
  Bottom Layer w0.254: R4.2 R20.2 15.24,26.162 ; R3.2 R19.2 15.24,56.388 ; R2.2 R18.2 15.24,86.233 ; R1.2 R17.2 18.191,116.078 17.818,115.705 17.818,115.507 15.24,112.928 15.24,86.233 ; SPI1.7 37.846,10.16 34.562,10.16 27.813,10.16 15.24,22.733 15.24,26.162 ; v2(40.767,13.843) 46.224,19.3 46.224,26.158 46.355,26.289 ; R8.2 R24.2 46.355,26.289 ; R7.2 R23.2 46.355,56.261 ; R6.2 R22.2 46.355,86.233 ; R5.2 R21.2 48.163,116.332 47.79,115.959 47.79,115.761 46.355,114.325 46.355,86.233 ; 15.24,26.162 15.24,56.388 ; 15.24,56.388 15.24,86.233 ; 46.355,26.289 46.355,56.261 ; 46.355,56.261 46.355,86.233
SPI1_MOSI: SPI1.3 U1.2 U2.2 U3.2 U4.2 U5.2 U6.2 U7.2 U8.2 | length 265.7
  Top Layer w0.254: U4.2 19.562,31.238 19.558,31.242 ; U3.2 19.582,61.238 19.558,61.214 ; U2.2 19.61,91.238 19.558,91.186 ; U1.2 19.558,117.146 19.558,91.186 ; U8.2 56.384,31.238 56.388,31.242 ; U7.2 56.237,61.238 56.388,61.087 ; U6.2 56.336,91.238 56.388,91.186 ; U5.2 56.388,118.5 56.388,91.186 ; 19.558,31.242 19.558,24.892 28.302,16.148 40.875,16.148 44.196,12.827 SPI1.3 48.771,16.005 56.388,23.622 56.388,31.242 ; 19.558,31.242 19.558,61.214 ; 19.558,61.214 19.558,91.186 ; 56.388,31.242 56.388,61.087 ; 56.388,61.087 56.388,91.186
SPI1_SCK: SPI1.11 U1.1 U2.1 U3.1 U4.1 U5.1 U6.1 U7.1 U8.1 | length 256.3
  Bottom Layer w0.254: U4.1 26.031,33.778 26.035,33.782 ; U3.1 26.011,63.778 26.035,63.754 ; U2.1 25.983,93.778 26.035,93.726 ; U1.1 26.035,121.393 26.035,93.726 ; U8.1 53.781,33.909 55.626,33.909 ; U7.1 55.602,63.778 55.626,63.754 ; U6.1 55.574,93.778 55.626,93.726 ; U5.1 55.626,121.802 55.626,93.726 ; 26.035,33.782 26.035,63.754 ; 26.035,33.782 26.035,19.431 SPI1.11 35.818,13.212 43.184,13.212 55.626,25.654 55.626,33.909 ; 26.035,63.754 26.035,93.726 ; 55.626,33.909 55.626,63.754 ; 55.626,63.754 55.626,93.726
SPI2_MISO: R9.2 R10.2 R11.2 R12.2 R13.2 R14.2 R15.2 R16.2 R25.2 R26.2 R27.2 R28.2 R29.2 R30.2 R31.2 R32.2 SPI2.7 | length 268.1
  Top Layer w0.254: v2@107.378,16.256 SPI2.7@112.204,11.43
  Layer 2 w0.254: v2(107.315,16.256) v2@107.378,16.256 ; SPI2.7@112.204,11.43 SPI2.7
  Bottom Layer w0.254: R11.2 R27.2 76.962,56.261 ; R9.2 R25.2 78.186,116.332 77.813,115.959 77.813,115.761 76.962,114.91 76.962,86.36 ; R12.2 R28.2 76.962,26.162 ; R10.2 R26.2 76.962,86.36 ; v2(107.315,16.256) 107.315,16.274 107.061,16.528 107.061,26.416 ; R16.2 R32.2 107.061,26.416 ; R13.2 R29.2 108.26,116.332 107.061,115.134 107.061,86.36 ; R15.2 R31.2 107.061,56.261 ; R14.2 R30.2 107.061,86.36 ; SPI2.7 110.998,10.16 107.714,10.16 92.075,10.16 76.962,25.273 76.962,26.162 ; 76.962,26.162 76.962,56.261 ; 76.962,56.261 76.962,86.36 ; 107.061,26.416 107.061,56.261 ; 107.061,56.261 107.061,86.36
SPI2_MOSI: SPI2.3 U9.2 U10.2 U11.2 U12.2 U13.2 U14.2 U15.2 U16.2 | length 260.9
  Top Layer w0.254: U12.2 87.241,31.238 ; U11.2 87.241,61.238 ; U10.2 87.245,91.238 ; U9.2 87.245,117.643 87.245,91.238 ; U16.2 115.947,31.238 115.951,31.242 ; U15.2 115.927,61.238 115.951,61.214 ; U14.2 115.899,91.238 115.951,91.186 ; U13.2 115.951,118.937 115.951,91.186 ; 87.241,31.238 87.241,61.238 ; 87.241,31.238 87.241,27.716 95.115,19.842 108.936,19.842 SPI2.3 117.348,13.462 115.951,14.859 115.951,31.242 ; 87.241,61.238 87.241,85.841 87.245,85.845 87.245,91.238 ; 115.951,31.242 115.951,61.214 ; 115.951,61.214 115.951,91.186
SPI2_SCK: SPI2.11 U9.1 U10.1 U11.1 U12.1 U13.1 U14.1 U15.1 U16.1 | length 250.7
  Bottom Layer w0.254: U12.1 85.856,33.778 85.979,33.655 ; U11.1 85.876,63.778 85.979,63.881 ; U10.1 85.875,93.778 85.979,93.674 ; U9.1 85.979,121.449 85.979,93.778 85.979,93.674 ; U16.1 115.193,33.778 115.316,33.655 ; U15.1 115.213,63.778 115.316,63.881 ; U14.1 115.264,93.778 115.316,93.726 ; U13.1 115.316,122.112 115.316,93.726 ; 85.979,33.655 85.979,32.639 SPI2.11 115.316,19.558 115.316,33.655 ; 85.979,33.655 85.979,33.778 85.979,63.778 85.979,63.881 ; 85.979,63.881 85.979,93.674 ; 115.316,33.655 115.316,63.881 ; 115.316,63.881 115.316,93.726
pads on no net: SPI1.15 SPI1.16 SPI2.15 SPI2.16

## Polygon pours and split planes (outlines as drawn)
GND on Layer 2 "GND_L03_P006" (solid, remove dead copper, pour order 6): 3.175,141.097 4.064,141.986 145.542,141.986 145.542,0.254 145.796,0 4.191,0 4.191,140.843 5.588,142.24
GND on Top Layer "GND_L01_P004" (solid, remove dead copper, pour order 4): 1.397,143.764 1.651,143.51 149.86,143.51 149.86,1.143 151.003,0 0,0 0,141.605 2.159,143.764
GND on Layer 1 "GND_L02_P005" (solid, remove dead copper, pour order 5): 2.794,140.589 3.048,140.843 145.796,140.843 145.796,0.381 145.415,0 3.81,0 3.81,140.335 4.445,140.97
GND on Bottom Layer "GND_L04_P007" (solid, remove dead copper, pour order 7): 4.064,140.97 4.445,141.351 147.828,141.351 147.828,0.889 146.939,0 2.54,0 2.54,139.7 3.81,140.97

## Keep-outs
Keep-Out Layer:
  the board outline again, w0.254

## Silkscreen, mask and mechanical layers (free items; w line width, h text height)
Top Overlay:
  text "AL3" at 65.913,18.288 h0.76 r90
  text "AL4" at 68.453,18.288 h0.76 r90
  text "AL7" at 70.993,18.288 h0.76 r90
  text "AL8" at 73.533,18.288 h0.76 r90
  text "AL11" at 75.946,18.288 h0.76 r90
  text "AL12" at 78.613,18.288 h0.76 r90
  text "AL15" at 81.153,18.288 h0.76 r90
  text "AL16" at 83.693,18.288 h0.76 r90
  text "MOSI" at 44.577,17.78 h0.76 r90
  text "MOSI" at 117.729,17.78 h0.76 r90
  text "GND" at 31.877,17.653 h0.76 r90
  text "SCK" at 34.417,17.653 h0.76 r90
  text "GND" at 36.957,17.653 h0.76 r90
  text "MISO" at 39.497,17.653 h0.76 r90
  text "GND" at 42.037,17.653 h0.76 r90
  text "3V3" at 47.117,17.653 h0.76 r90
  text "GND" at 105.029,17.653 h0.76 r90
  text "SCK" at 107.569,17.653 h0.76 r90
  text "GND" at 110.109,17.653 h0.76 r90
  text "MISO" at 112.649,17.653 h0.76 r90
  text "GND" at 115.189,17.653 h0.76 r90
  text "3V3" at 120.269,17.653 h0.76 r90
  text "B1" at 39.497,15.113 h0.76 r90
  text "AL1" at 65.913,15.113 h0.76 r90
  text "AL2" at 68.453,15.113 h0.76 r90
  text "AL5" at 70.993,15.113 h0.76 r90
  text "AL6" at 73.533,15.113 h0.76 r90
  text "AL9" at 75.946,15.113 h0.76 r90
  text "AL10" at 78.613,15.113 h0.76 r90
  text "AL13" at 81.153,15.113 h0.76 r90
  text "AL14" at 83.693,15.113 h0.76 r90
  text "B2" at 112.649,15.113 h0.76 r90
  text "GND" at 31.877,14.986 h0.76 r90
  text "C1" at 34.417,14.986 h0.76 r90
  text "GND" at 36.957,14.986 h0.76 r90
  text "GND" at 42.037,14.986 h0.76 r90
  text "A1" at 44.577,14.986 h0.76 r90
  text "3V3" at 47.117,14.986 h0.76 r90
  text "GND" at 105.029,14.986 h0.76 r90
  text "C2" at 107.569,14.986 h0.76 r90
  text "GND" at 110.109,14.986 h0.76 r90
  text "GND" at 115.189,14.986 h0.76 r90
  text "A2" at 117.729,14.986 h0.76 r90
  text "3V3" at 120.269,14.986 h0.76 r90